# Altium PCB AmbientPro_Secondary_Board_V1.0.PcbDoc
Units mil, origin at the board's own origin, x right, y up, seen from the top; angles counter-clockwise.
Board outline 1338.58 x 452.76 mil, 4 copper layers (Top Layer, Layer 1, Layer 2, Bottom Layer), stack 61.613 mil thick; 32 components, 23 nets, 124 pads, 42 vias.
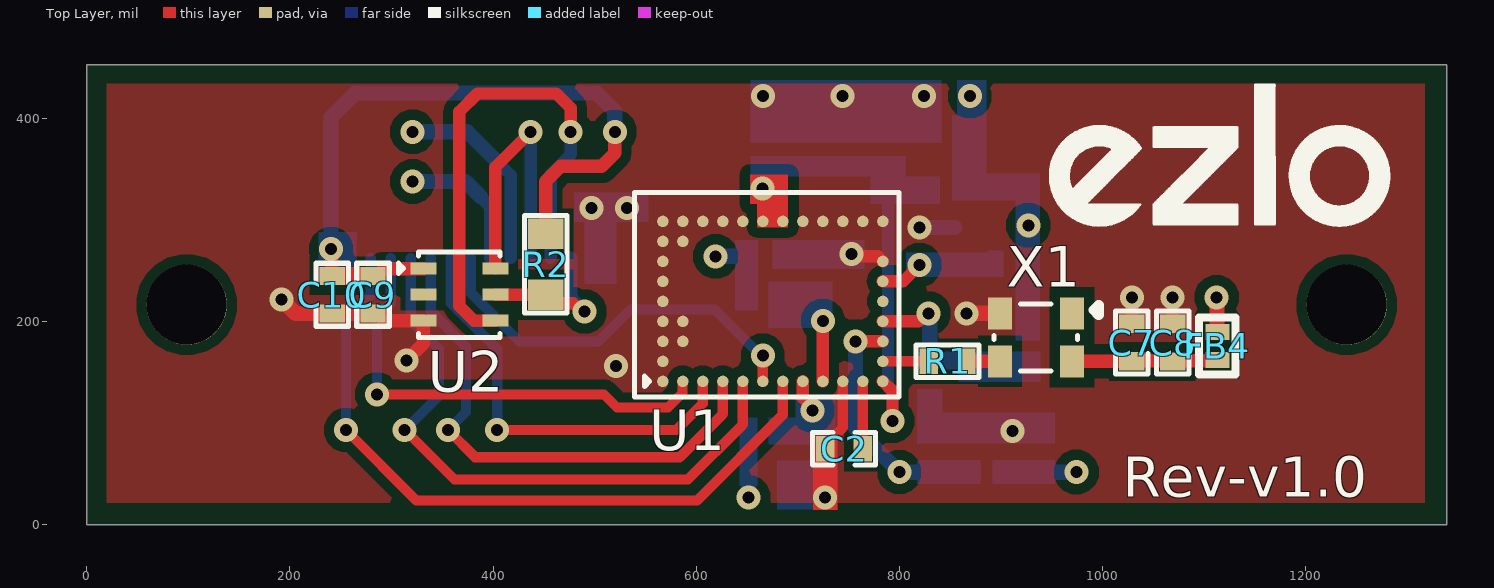
[diagram p0: Top Layer view]
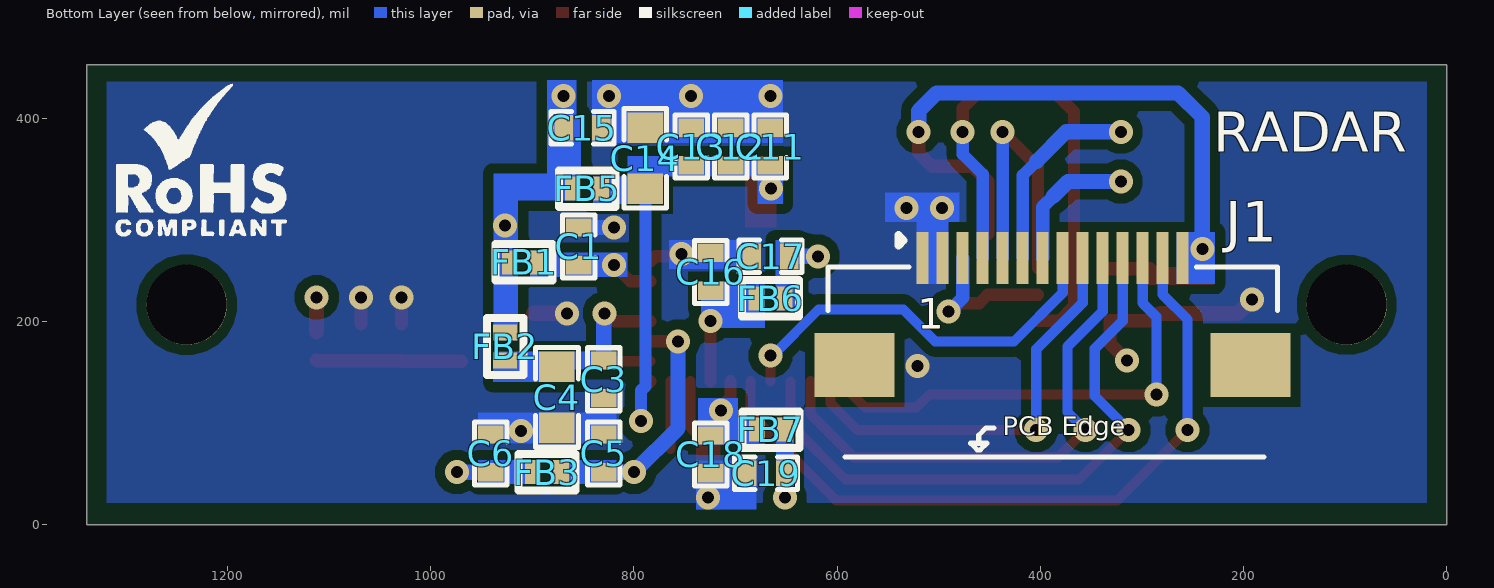
[diagram p1: Bottom Layer view, seen from below]
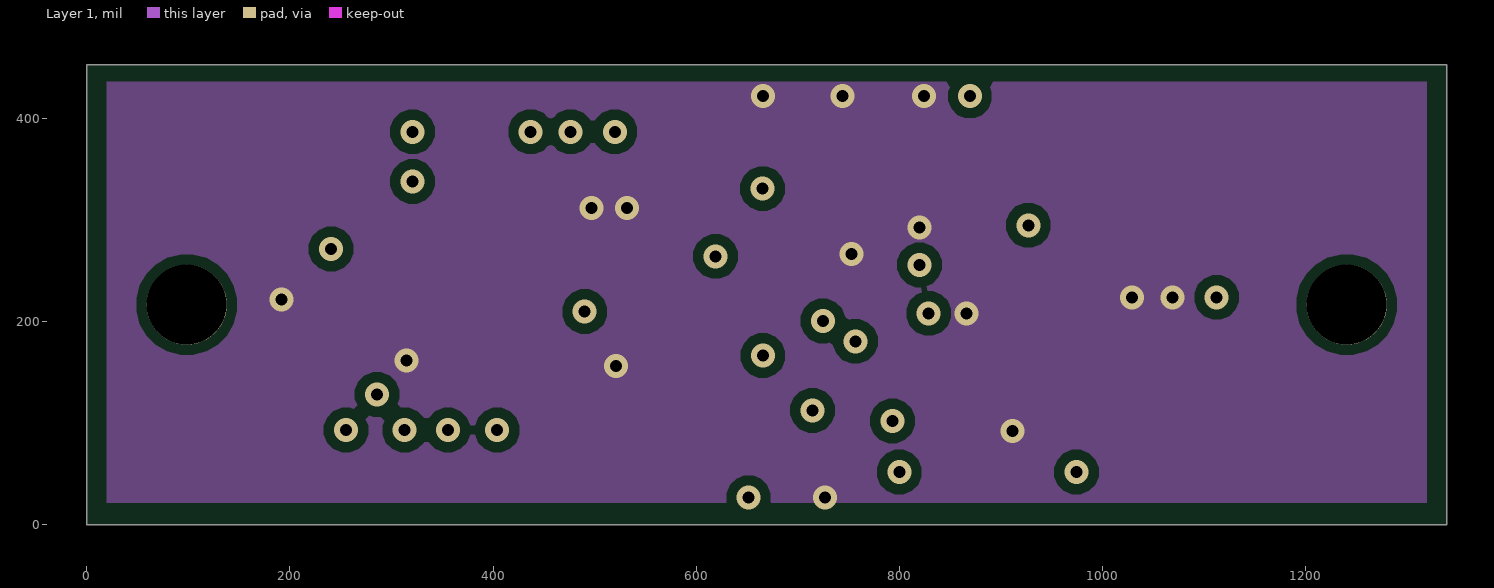
[diagram p2: Layer 1]
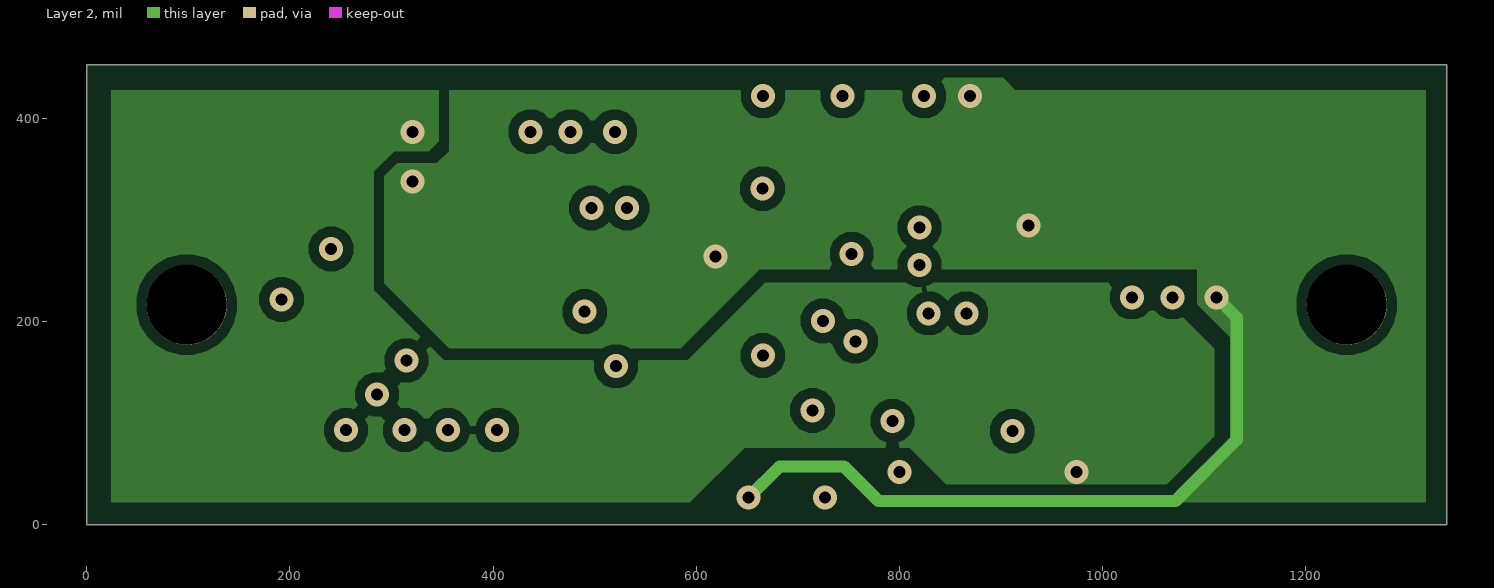
[diagram p3: Layer 2]
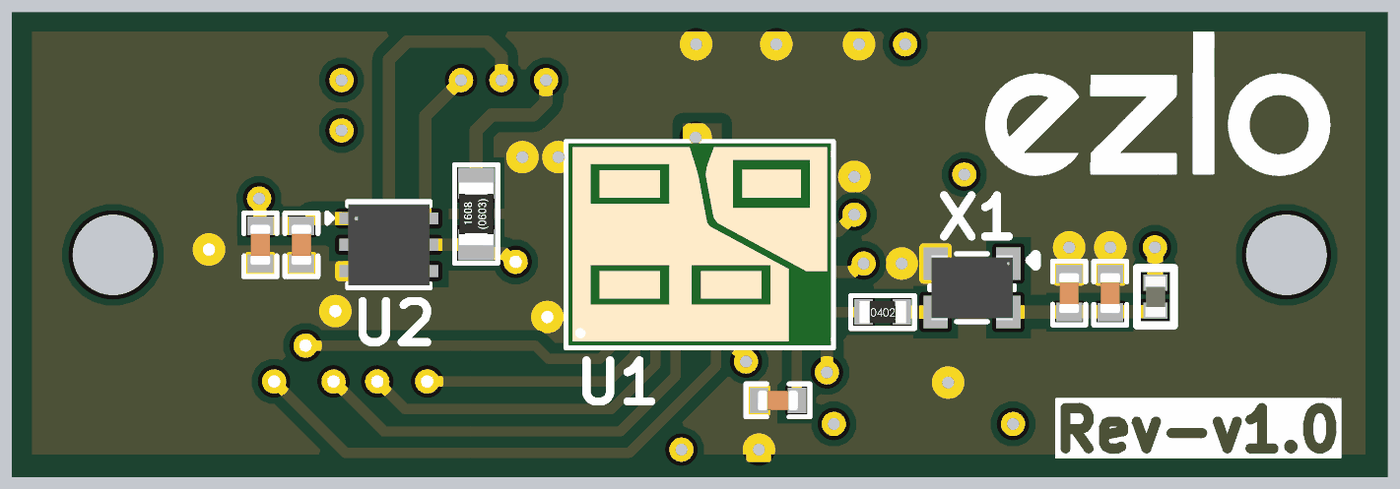
[diagram p4: 3D render of the assembled board from above, using the file's embedded part models]
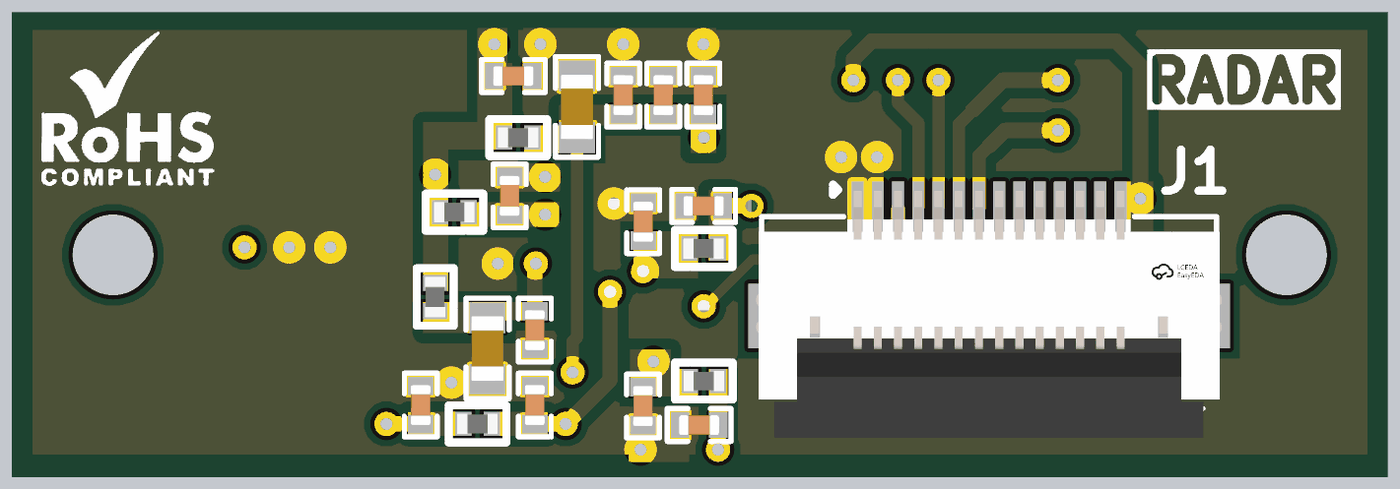
[diagram p5: 3D render of the assembled board from below, using the file's embedded part models]

## Layer stack, top to bottom
Top Solder: solder mask 0.787, Solder Resist, Dk 3.5
Top Layer: signal copper 1.378
Dielectric 2: prepreg 7.992, PP-006, Dk 4.4
Layer 1: signal copper 1.181
Dielectric 1: core 40.511, FR-4, Dk 4.6
Layer 2: signal copper 1.181
Dielectric 3: prepreg 7.992, PP-006, Dk 4.4
Bottom Layer: signal copper 1.378
Bottom Solder: solder mask 0.787, Solder Resist, Dk 3.5

## Board outline
0,0 0,452.76 1338.58,452.76 1338.58,0

## Design rules (kind name [scope] priority, off if disabled: settings)
Clearance [All] p1: gap=10 ignorepadtopadclearanceinfootprint=TRUE except(0: Arc-Hole Track-Hole SMDPad-Hole THPad-Hole Via-Hole Fill-Hole Poly-Hole Region-Hole Text-Hole; 6: Arc-Arc Arc-Track Arc-SMDPad Track-Track Track-SMDPad Track-Fill SMDPad-SMDPad; 7: SMDPad-Fill)
MinimumSolderMaskSliver [All] p1: minsoldermaskwidth=0
PolygonConnect [All] p1: thpad.connectstyle=Relief thpad.reliefconductorwidth=15 thpad.reliefentries=4 thpad.polygonreliefangle="45 Angle" thpad.airgapwidth=10 smdpad.connectstyle=Direct smdpad.reliefconductorwidth=10 smdpad.reliefentries=4 smdpad.polygonreliefangle="90 Angle" smdpad.airgapwidth=10 via.connectstyle=Direct via.reliefconductorwidth=10 via.reliefentries=4 via.polygonreliefangle="90 Angle" via.airgapwidth=10
RoutingVias [All] p1: holewidth=11.81 width=23.62 viastyle="Through Hole" minholewidth=11.81 minwidth=23.62 maxholewidth=11.81 maxwidth=23.62
SilkToSilkClearance [All] p1: silktosilkclearance=0
SilkToSolderMaskClearance [IsPad] p1: minsilkscreentomaskgap=0 clearancetoexposedcopper=TRUE
SolderMaskExpansion [All] p1: expansion=4 istentingtop=FALSE
UnRoutedNet [All] p1: checkbadconnections=TRUE
Width [All] p1: maxlimit=50 minlimit=8 preferedwidth=15 minimp=50.000000 maximp=50.000000 favimp=50.000000
26 further rules are at their usual default settings.

## Components (designator, comment, footprint, x,y, rotation, side; value= is the part's Value field where it differs from the comment)
C1 "1uF" Cap-0402 854.25,274.03 r270 bottom locked
C2 "0.47uF" Cap-0402 745.37,74.75 r180 top locked
C3 "1uF" Cap-0402 829.75,143.2 r90 bottom locked
C4 "22uF" Cap-0603 875.75,125.25 r90 bottom locked
C5 "1uF" Cap-0402 829.75,70.25 r270 bottom locked
C6 "10uF" Cap-0402 940.75,70.25 r270 bottom locked
C7 "10nF" Cap-0402 1028.75,179.32 r270 top locked
C8 "1uF" Cap-0402 1068.75,179.25 r90 top locked
C9 "0.1uF" Cap-0402 281.75,226.38 r90 top locked
C10 "1uF" Cap-0402 241.75,226.38 r90 top locked
C11 "1uF" Cap-0402 665.75,372.25 r270 bottom locked
C12 "1uF" Cap-0402 704.75,372.25 r270 bottom locked
C13 "1uF" Cap-0402 743.75,372.25 r270 bottom locked
C14 "22uF" Cap-0603 788.75,360.75 r270 bottom locked
C15 "10uF" Cap-0402 850.68,390.75 r0 bottom locked
C16 "0.1uF" Cap-0402 724.28,248.85 r270 bottom locked
C17 "10uF" Cap-0402 665.5,264.18 r180 bottom locked
C18 "1uF" Cap-0402 724.5,69.25 r90 bottom locked
C19 "10uF" Cap-0402 669.87,50.75 r180 bottom locked
FB1 "100MHz" IND-0402 908.03,258.14 r0 bottom locked
FB2 "100MHz" IND-0402 926.75,175.48 r90 bottom locked
FB3 "100MHz" IND-0402 885.53,51.75 r0 bottom locked
FB4 "100MHz" IND-0402 1112.75,175.75 r90 top locked
FB5 "100MHz" IND-0402 845.96,330.75 r0 bottom locked
FB6 "100MHz" IND-0402 665.5,222.75 r180 bottom locked
FB7 "100MHz" IND-0402 665.25,93.56 r180 bottom locked
J1 "AFC01-S14FCC-00" AFC01-S14FCC-00 387.8,209.75 r180 bottom locked
R1 "150R" Res-0402 847.25,160.82 r0 top locked
R2 "10K" Res-0603 451.75,256.38 r270 top locked
U1 "BGT60TR13CE6327XUMA1" pg-vf2bga-40 675.29,219.88 r0 top locked
U2 "LTR-303ALS" "6-Pin ChipLED" 366.75,226.38 r0 top locked
X1 "80MHz" KC2016K 934.18,184.45 r180 top locked

## Footprints (in the part's own frame and the unit in brackets; to place one, negate y for a bottom-side part, rotate by r counter-clockwise, add the part's x,y. Pads: shape width x height; smd on the part's side, far side on the other; paste and mask are expansions set on the pad)
"6-Pin ChipLED" [mm] "SENSOR OPT AMBIENT 6DFN"
  rect 0.65x0.3 smd: 1(-0.9,0.65) 2(-0.9,0) 3(-0.9,-0.65) 4(0.9,-0.65) 5(0.9,0) 6(0.9,0.65)
  silkscreen extent -1.52,-1.07 1.02,1.07, body extent -1,-1 1,1, height 0.71
AFC01-S14FCC-00 [mm]
  rect 0.3x1.3 smd: 1(-3.25,1.34) 2(-2.75,1.34) 3(-2.25,1.34) 4(-1.75,1.34) 5(-1.25,1.34) 6(-0.75,1.34) 7(-0.25,1.34) 8(0.25,1.34) 9(0.75,1.34) 10(1.25,1.34) 11(1.75,1.34) 12(2.25,1.34) 13(2.75,1.34) 14(3.25,1.34)
  rect 2x1.6 smd: MP1(-4.95,-1.34) MP2(4.95,-1.34)
  silkscreen extent -5.62,-3.63 5.62,1.91, body extent -5.75,-4.35 5.75,1.75, height 2.01
Cap-0402 [mil]
  rect 18x25 smd mask+2.36: 1(-18.5,0) 2(18.5,0)
  silkscreen extent -31,-16 31,16, body extent -20,-10 20,10, height 19
Cap-0603 [mil]
  rect 30x35 smd mask+2.36: 1(-30,0) 2(30,0)
  silkscreen extent -49,-21 49,21, body extent -32,-16 31,16, height 34
IND-0402 [mm]
  rect 0.4x0.6 smd: 1(-0.35,0) 2(0.35,0)
  silkscreen extent -0.71,-0.46 0.71,0.46, body extent -0.5,-0.25 0.5,0.25, height 0.25
KC2016K [mm]
  rect 0.6x0.8 smd: 1(-0.9,-0.6) 2(0.9,-0.6) 3(0.9,0.6) 4(-0.9,0.6)
  silkscreen extent -1.57,-0.84 1.04,0.84, body extent -1,-0.8 1,0.8, height 0.81
pg-vf2bga-40 [mm]
  round 0.285 smd: A1(-2.75,-2) A2(-2.75,-1.5) A3(-2.75,-1) A4(-2.75,-0.5) A5(-2.75,0) A6(-2.75,0.5) A7(-2.75,1) A8(-2.75,1.5) A9(-2.75,2) B1(-2.25,-2) B3(-2.25,-1) B4(-2.25,-0.5) B8(-2.25,1.5) B9(-2.25,2) C1(-1.75,-2) C9(-1.75,2) D1(-1.25,-2) D9(-1.25,2) E1(-0.75,-2) E9(-0.75,2) F1(-0.25,-2) F9(-0.25,2) G1(0.25,-2) G9(0.25,2) H1(0.75,-2) H9(0.75,2) J1(1.25,-2) J9(1.25,2) K1(1.75,-2) K9(1.75,2) L1(2.25,-2) L9(2.25,2) M1(2.75,-2) M2(2.75,-1.5) M3(2.75,-1) M4(2.75,-0.5) M5(2.75,0) M6(2.75,0.5) M7(2.75,1) M9(2.75,2)
  silkscreen extent -3.45,-2.39 3.15,2.72, body extent -3.4,-2.32 3.1,2.68, height 0.9
Res-0402 [mil]
  rect 18x25 smd mask+2.17: 1(-18.5,0) 2(18.5,0)
  silkscreen extent -32,-17 32,16, body extent -23,-11 23,11, height 16
Res-0603 [mil]
  rect 30x35 smd: 1(-30,0) 2(30,0)
  silkscreen extent -48,-21 48,21, body extent -31,-17 31,17, height 18

## Part data
C1 C3 C5 C8 C10 C11 C12 C13 C18: library part CC0402KRX5R6BB105, "CAP CER 1UF 10V X5R 0402", Case Code (Imperial)=0402, Case Code (Metric)=1005, Dielectric=X5R, LCSC Part Number=C106254, Manufacturer=Yageo, Max Operating Temperature=85°C, Min Operating Temperature=-55°C, Package Quantity=1, Resistor Type=Ceramic, Supplier Part Number 1=603-CC402KRX5R6BB105, Tolerance=10%, Voltage Rating=10V, Capacitance=1uF, Case/Package=0402, Category="Ceramic Capacitors", ComponentLink1Description=https://datasheet.ciiva.com/176/upy-gphc-x5r-4v-to-50v-12-176704.pdf?src-supplier=Digi-Key, ComponentLink1URL=https://datasheet.ciiva.com/176/upy-gphc-x5r-4v-to-50v-12-176704.pdf?src-supplier=Digi-Key, ComponentLink2Description=https://datasheet.ciiva.com/176/mlccorderingcode-176705.pdf?src-supplier=Digi-Key, ComponentLink2URL=https://datasheet.ciiva.com/176/mlccorderingcode-176705.pdf?src-supplier=Digi-Key, ComponentLink3Description=https://datasheet.ciiva.com/176/mlccorderingcode-176706.pdf?src-supplier=Digi-Key, ComponentLink3URL=https://datasheet.ciiva.com/176/mlccorderingcode-176706.pdf?src-supplier=Digi-Key, Construction=Flat, Depth=0.5mm, Dissipation Factor=15%, Halogen Free="Halogen Free", Height=0.5mm, Lead Free="Lead Free", Length=1mm, Manufacturer Part Number=CC0402KRX5R6BB105, Mount="Surface Mount", Number of Pins=2, Packaging="Tape and Reel", Pricing 1="1=0.11000, 10=0.05500, 50=0.05500, 100=0.03300, 500=0.02700, 1000=0.02200, 2500=0.02100, 10000=0.01800 (USD)", Radiation Hardening=No, REACH SVHC="No SVHC", RoHS=Yes, RoHS Compliant=Yes, Series=CC, Stock 1=6711367, Supplier 1=Mouser, Termination=SMD/SMT, Thickness=0.022inch, Voltage Rating (DC)=10V, Width=0.02inch
C2: library part UMK105ABJ474KV-F, "CAP CER 0.47UF 50V X5R 0402", Capacitance=470nF, Case Code (Imperial)=0402, Case Code (Metric)=1005, Dielectric=X5R, LCSC Part Number=C386109, Manufacturer="Taiyo Yuden", Max Operating Temperature=85°C, Min Operating Temperature=-55°C, Package Quantity=10000, Supplier Part Number 1=587-3497-1-ND, Tolerance=10%, Voltage Rating=50V, Case/Package=0402, Category="Ceramic Capacitors", ComponentLink1Description=https://datasheet.ciiva.com/30249/584umk105abj474kv-f-30249824.pdf?src-supplier=Onlinecomponents.com, ComponentLink1URL=https://datasheet.ciiva.com/30249/584umk105abj474kv-f-30249824.pdf?src-supplier=Onlinecomponents.com, ComponentLink2Description=https://datasheet.ciiva.com/24370/10umk105abj474kv-f-24370678.pdf?src-supplier=Onlinecomponents.com, ComponentLink2URL=https://datasheet.ciiva.com/24370/10umk105abj474kv-f-24370678.pdf?src-supplier=Onlinecomponents.com, ComponentLink3Description=https://datasheet.ciiva.com/18697/mlcc-all-e-18697429.pdf?src-supplier=Digi-Key, ComponentLink3URL=https://datasheet.ciiva.com/18697/mlcc-all-e-18697429.pdf?src-supplier=Digi-Key, ComponentLink4Description=https://datasheet.ciiva.com/18697/mlcc-all-e-18697430.pdf?src-supplier=Digi-Key, ComponentLink4URL=https://datasheet.ciiva.com/18697/mlcc-all-e-18697430.pdf?src-supplier=Digi-Key, ComponentLink5Description=https://datasheet.ciiva.com/18697/mlcc-all-e-18697431.pdf?src-supplier=Digi-Key, ComponentLink5URL=https://datasheet.ciiva.com/18697/mlcc-all-e-18697431.pdf?src-supplier=Digi-Key, Height=0.5mm, Item Type=Capacitor, Lead Free="Lead Free", Length=0.039inch, Manufacturer Part Number=UMK105ABJ474KV-F, Mount="Surface Mount", Packaging="Tape and Reel", Pricing 1="1=0.24000, 10=0.16100, 50=0.09680, 100=0.08170, 500=0.05592, 1000=0.04946, 2500=0.04731, 5000=0.04301 (USD)", RoHS=Yes, RoHS Compliant=Yes, Stock 1=145003, Supplier 1=Digi-Key, Termination=SMD/SMT, Thickness=0.022inch, Voltage Rating (DC)=50V, Width=0.02inch
C4 C14: library part CC0603MRX5R6BB226, "CAP CER 22UF 10V X5R 0603", Case Code (Imperial)=0603, Case Code (Metric)=1608, Dielectric=X5R, LCSC Part Number=C109447, Manufacturer=Yageo, Max Operating Temperature=85°C, Min Operating Temperature=-55°C, Package Quantity=4000, Supplier Part Number 1=311-1819-1-ND, Tolerance=20%, Voltage Rating=10V, Capacitance=22uF, Case/Package=0603, Category="Ceramic Capacitors", ComponentLink1Description=http://www.mouser.com/ds/2/447/Yageo_UPY-GP_NP0_16V-to-50V_9-358835.pdf?src-supplier=Mouser, ComponentLink1URL=http://www.mouser.com/ds/2/447/Yageo_UPY-GP_NP0_16V-to-50V_9-358835.pdf?src-supplier=Mouser, ComponentLink2Description=http://www.yageo.com/documents/recent/UPY-GPHC_X5R_4V-to-50V_25.pdf?src-supplier=Digi-Key, ComponentLink2URL=http://www.yageo.com/documents/recent/UPY-GPHC_X5R_4V-to-50V_25.pdf?src-supplier=Digi-Key, Halogen Free="Halogen Free", Height=0.8mm, Lead Free="Lead Free", Length=0.063inch, Manufacturer Part Number=CC0603MRX5R6BB226, Mount="Surface Mount", Packaging="Tape and Reel", Pricing 1="1=0.68000, 10=0.48000, 50=0.36300, 100=0.31610, 500=0.23416, 1000=0.19903 (USD)", RoHS=Yes, RoHS Compliant=Yes, Stock 1=19628, Supplier 1=Digi-Key, Termination=SMD/SMT, Thickness=0.035inch, Voltage Rating (DC)=10V, Weight=7.1E-05oz, Width=0.8mm
C6 C15 C17 C19: library part CL05A106MP5NUNC, "CAP CER 10UF 10V X5R 0402", Case Code (Imperial)=0402, Case Code (Metric)=1005, Dielectric=X5R, LCSC Part Number=C315248, Manufacturer=Samsung, Max Operating Temperature=85°C, Min Operating Temperature=-55°C, Package Quantity=1, Tolerance=20%, Voltage Rating=10V, Capacitance=10uF, Case/Package=0402, Category="Ceramic Capacitors", ComponentLink1Description=https://datasheet.ciiva.com/25721/cl05a106mp5nunc-25721584.pdf?src-supplier=Digi-Key, ComponentLink1URL=https://datasheet.ciiva.com/25721/cl05a106mp5nunc-25721584.pdf?src-supplier=Digi-Key, ComponentLink2Description=https://datasheet.ciiva.com/26838/getdatasheetpartid-745310-26838170.pdf?src-supplier=Verical, ComponentLink2URL=https://datasheet.ciiva.com/26838/getdatasheetpartid-745310-26838170.pdf?src-supplier=Verical, Construction=Flat, Contact Plating=Tin, Depth=0.5mm, Item Type=Capacitor, Lead Free="Lead Free", Length=1mm, Manufacturer Part Number=CL05A106MP5NUNC, Mount="Surface Mount", Packaging="Tape and Reel", Pricing 1="10000=0.02537 (USD)", Radiation Hardening=No, RoHS=Yes, RoHS Compliant=Yes, Series=CL, Stock 1=1729850, Supplier 1=Avnet, Supplier Part Number 1=CL05A106MP5NUNC, Termination=Wraparound, Thickness=0.028inch, Width=0.02inch
C7: library part CC0402KRX7R8BB103, "CAP CER 10000PF 25V X7R 0402", Case Code (Imperial)=0402, Case Code (Metric)=1005, Dielectric=X7R, LCSC Part Number=C327025, Manufacturer=Yageo, Max Operating Temperature=125°C, Min Operating Temperature=-55°C, Package Quantity=1, Supplier Part Number 1=311-1337-1-ND, Tolerance=10%, Voltage Rating=25V, Capacitance=10nF, Case/Package=0402, ComponentLink1Description=http://www.yageo.com/documents/recent/UPY-GPHC_X7R_6.3V-to-50V_18.pdf?src-supplier=Digi-Key, ComponentLink1URL=http://www.yageo.com/documents/recent/UPY-GPHC_X7R_6.3V-to-50V_18.pdf?src-supplier=Digi-Key, ComponentLink2Description=https://www.verical.com/server-webapp/html/getDatasheet?partID=375418&src-supplier=Verical, ComponentLink2URL=https://www.verical.com/server-webapp/html/getDatasheet?partID=375418&src-supplier=Verical, ComponentLink3Description=http://www.yageo.com/documents/recent/UPY-GPHC_X7R_6.3V-to-50V_8.pdf?src-supplier=Avnet, ComponentLink3URL=http://www.yageo.com/documents/recent/UPY-GPHC_X7R_6.3V-to-50V_8.pdf?src-supplier=Avnet, ComponentLink4Description=https://4donline.ihs.com/images/VipMasterIC/IC/YAGO/YAGO-S-A0003557223/YAGO-S-A0003557223-1.pdf?hkey=52A5661711E402568146F3353EA87419&src-supplier=Element14, ComponentLink4URL=https://4donline.ihs.com/images/VipMasterIC/IC/YAGO/YAGO-S-A0003557223/YAGO-S-A0003557223-1.pdf?hkey=52A5661711E402568146F3353EA87419&src-supplier=Element14, ComponentLink5Description=http://www.farnell.com/datasheets/2167236.pdf?src-supplier=Element14, ComponentLink5URL=http://www.farnell.com/datasheets/2167236.pdf?src-supplier=Element14, ComponentLink6Description=http://www.mouser.com/ds/2/447/Yageo_UPY-GP_NP0_16V-to-50V_9-358835.pdf?src-supplier=Mouser, ComponentLink6URL=http://www.mouser.com/ds/2/447/Yageo_UPY-GP_NP0_16V-to-50V_9-358835.pdf?src-supplier=Mouser, Composition=Ceramic, Depth=0.5mm, Halogen Free="Halogen Free", Height=0.5mm, Lead Free="Lead Free", Length=1mm, Manufacturer Part Number=CC0402KRX7R8BB103, Mount="Surface Mount", Packaging="Tape and Reel", Pricing 1="1=0.1, 10=0.021, 100=0.0093, 500=0.00666, 1000=0.00523, 2500=0.00476, 5000=0.00438 (USD)", Radiation Hardening=No, REACH SVHC=Unknown, Stock 1=0, Supplier 1=Digi-Key, Termination=SMD/SMT, Thickness=0.022inch, Voltage Rating (DC)=25V, Width=0.02inch
C9: library part C1005X5R1H104K050BB, "CAP CER 0.1UF 50V X5R 0402", Capacitance=100nF, Case Code (Imperial)=0402, Case Code (Metric)=1005, Dielectric=X5R, Dielectric Material=Ceramic, LCSC Part Number=C2181865, Manufacturer=TDK, Max Operating Temperature=85°C, Min Operating Temperature=-55°C, Package Quantity=1, Supplier Part Number 1=445-5942-1-ND, Tolerance=10%, Voltage=50V, Case/Package=0402, ComponentLink1Description=https://product.tdk.com/info/en/catalog/spec/mlccspec_commercial_general_midvoltage_en.pdf?src-supplier=Digi-Key, ComponentLink1URL=https://product.tdk.com/info/en/catalog/spec/mlccspec_commercial_general_midvoltage_en.pdf?src-supplier=Digi-Key, ComponentLink2Description=http://www.tdk.co.jp/tefe02/e413_c.pdf?src-supplier=Future+Electronics, ComponentLink2URL=http://www.tdk.co.jp/tefe02/e413_c.pdf?src-supplier=Future+Electronics, ComponentLink3Description=https://www.verical.com/server-webapp/html/getDatasheet?partID=743571&src-supplier=Verical, ComponentLink3URL=https://www.verical.com/server-webapp/html/getDatasheet?partID=743571&src-supplier=Verical, ComponentLink4Description=http://www.tdk.co.jp/tefe02/e412_c.pdf?src-supplier=Avnet+Europe, ComponentLink4URL=http://www.tdk.co.jp/tefe02/e412_c.pdf?src-supplier=Avnet+Europe, Construction=Flat, Depth=0.5mm, Height=0.5mm, Lead Free="Lead Free", Length=1mm, Manufacturer Part Number=C1005X5R1H104K050BB, Mount="Surface Mount", Packaging="Tape and Reel", Pricing 1="1=0.12, 10=0.09, 50=0.049, 100=0.04, 500=0.02858, 1000=0.02245, 2500=0.02041, 5000=0.01878 (USD)", Radiation Hardening=No, REACH SVHC="No SVHC", Resistor Type=Ceramic, RoHS Compliant=Yes, Series=C, Stock 1=1455182, Supplier 1=Digi-Key, Termination=SMD/SMT, Thickness=0.022inch, Voltage Rating=50V, Voltage Rating (DC)=50V, Weight=2.3E-05oz, Width=0.02inch
C16: library part CL05B104KB54PNC, "CAP CER 0.1UF 50V X7R 0402", LCSC Part Number=C307331, Manufacturer=Samsung, Supplier Part Number 1=1276-CL05B104KB54PNCDKR-ND, Manufacturer Part Number=CL05B104KB54PNC, Pricing 1="1=0.1, 10=0.067, 50=0.0366, 100=0.0299, 500=0.02138, 1000=0.01681, 2500=0.01528, 5000=0.01406 (USD)", Stock 1=8594, Supplier 1=Digi-Key
FB1 FB2 FB3 FB4 FB5 FB6 FB7: library part BLM15PD121SN1D, "FERRITE BEAD 120 OHM 0402 1LN", Case Code (Imperial)=0402, Case Code (Metric)=1005, Current Rating=1.3A, DC Resistance (DCR)=90mR, LCSC Part Number=C76891, Manufacturer=Murata, Max Operating Temperature=125°C, Min Operating Temperature=-55°C, Package Quantity=1, Tolerance=25%, Case/Package=0402, Category="Ferrite Beads and Chips", ComponentLink1Description=https://datasheet.ciiva.com/11800/0900766b811b5866-11800860.pdf?src-supplier=RSComponents, ComponentLink1URL=https://datasheet.ciiva.com/11800/0900766b811b5866-11800860.pdf?src-supplier=RSComponents, ComponentLink2Description=https://datasheet.ciiva.com/18093/getdatasheetpartid-195858-18093157.pdf?src-supplier=Verical, ComponentLink2URL=https://datasheet.ciiva.com/18093/getdatasheetpartid-195858-18093157.pdf?src-supplier=Verical, ComponentLink3Description=https://datasheet.ciiva.com/41425/001171686-da-01-en-chip-drossel0402-120r-1300ma-1-0x0-5mm-41425776.pdf?src-supplier=Conrad, ComponentLink3URL=https://datasheet.ciiva.com/41425/001171686-da-01-en-chip-drossel0402-120r-1300ma-1-0x0-5mm-41425776.pdf?src-supplier=Conrad, ComponentLink4Description=https://datasheet.ciiva.com/41449/001172205-da-01-en-drossel-0402-120r-11-0x0-5mm-10000st-41449495.pdf?src-supplier=Conrad, ComponentLink4URL=https://datasheet.ciiva.com/41449/001172205-da-01-en-drossel-0402-120r-11-0x0-5mm-10000st-41449495.pdf?src-supplier=Conrad, ComponentLink5Description=https://datasheet.ciiva.com/1012/l0110e-1012435.pdf?src-supplier=Digi-Key, ComponentLink5URL=https://datasheet.ciiva.com/1012/l0110e-1012435.pdf?src-supplier=Digi-Key, ComponentLink6Description=https://datasheet.ciiva.com/1012/l0110e-1012434.pdf?src-supplier=Digi-Key, ComponentLink6URL=https://datasheet.ciiva.com/1012/l0110e-1012434.pdf?src-supplier=Digi-Key, ComponentLink7Description=https://datasheet.ciiva.com/1012/l0110e-1012436.pdf?src-supplier=Digi-Key, ComponentLink7URL=https://datasheet.ciiva.com/1012/l0110e-1012436.pdf?src-supplier=Digi-Key, Core Material=Ferrite, DC Current=1.3A, DC Resistance-Max=90mR, Depth=0.55mm, Height=0.5mm, Impedance=120R, Item Type="Ferrite Bead", Lead Free="Lead Free", Length=1mm, Manufacturer Part Number=BLM15PD121SN1D, Material=Steel,Ferrite, Max Current Rating=1.3A, Max DC Current=1.3A, Military Standard=Not, Number of Circuits=1, Number of Lines=1, Number of Pins=2, Packaging="Tape and Reel", Pricing 1="10000=0.03238, 20000=0.03063, 40000=0.02888, 60000=0.02713, 80000=0.02538, 100000=0.02363, 1000000=0.02188 (USD)", Radiation Hardening=No, Reach SVHC Compliant=Yes, RoHS=Yes, RoHS Compliant=Yes, Series=BLM15PD, Stock 1=300000, Supplier 1=Avnet, Supplier Part Number 1=BLM15PD121SN1D, Termination=SMD/SMT, Test Frequency=100MHz, Width=0.5mm
J1: "Clamshell 14P Bottom Contact Surface Mount 0.5mm SMD,P=0.5mm FFC/FPC Connectors ROHS", LCSC Part Number=C577443, Manufacturer=JUSHUO, Package=SMD,P=0.5mm, ComponentLink1Description=LCSC, ComponentLink1URL=https://www.lcsc.com/product-detail/FFC-FPC-Connectors_JUSHUO-AFC01-S14FCC-00_C577443.html, Item Type="FFC/FPC Connector", Manufacturer Part Number=AFC01-S14FCC-00
R1: library part ERJ-2GEJ151X, "RES SMD 150 OHM 5% 1/10W 0402", Case Code (Imperial)=0402, Case Code (Metric)=1005, LCSC Part Number=C412976, Manufacturer=Panasonic, Max Operating Temperature=155°C, Max Power Dissipation=100mW, Min Operating Temperature=-55°C, Package Quantity=10000, Ratings=AEC-Q200, Resistance Tolerance=5%, Resistor Type="Thick Film", Supplier Part Number 1=65T8254, Temperature Coefficient=200ppm/°C, Voltage Rating=50V, Case/Package=0402, Category="Chip SMD Resistors", ComponentLink1Description=https://datasheet.ciiva.com/11821/0900766b80f806dd-11821182.pdf?src-supplier=RSComponents, ComponentLink1URL=https://datasheet.ciiva.com/11821/0900766b80f806dd-11821182.pdf?src-supplier=RSComponents, ComponentLink2Description=https://datasheet.ciiva.com/43460/1500035-43460367.pdf?src-supplier=Farnell, ComponentLink2URL=https://datasheet.ciiva.com/43460/1500035-43460367.pdf?src-supplier=Farnell, ComponentLink3Description=https://datasheet.ciiva.com/6082/1500035-6082105.pdf?src-supplier=Farnell, ComponentLink3URL=https://datasheet.ciiva.com/6082/1500035-6082105.pdf?src-supplier=Farnell, ComponentLink4Description=https://datasheet.ciiva.com/46377/1500035-46377070.pdf?src-supplier=Element14, ComponentLink4URL=https://datasheet.ciiva.com/46377/1500035-46377070.pdf?src-supplier=Element14, ComponentLink5Description=https://datasheet.ciiva.com/28568/1678796-28568939.pdf?src-supplier=Element14, ComponentLink5URL=https://datasheet.ciiva.com/28568/1678796-28568939.pdf?src-supplier=Element14, ComponentLink6Description=https://datasheet.ciiva.com/16773/70260739-16773454.pdf?src-supplier=Allied+Electronics, ComponentLink6URL=https://datasheet.ciiva.com/16773/70260739-16773454.pdf?src-supplier=Allied+Electronics, ComponentLink7Description=https://datasheet.ciiva.com/30178/4aoa0000ce1-30178453.pdf?src-supplier=Onlinecomponents.com, ComponentLink7URL=https://datasheet.ciiva.com/30178/4aoa0000ce1-30178453.pdf?src-supplier=Onlinecomponents.com, Construction=Rectangular, Contact Plating=Tin, Depth=0.5mm, Features="Automotive AEC-Q200", Height=0.35mm, Item Type=Resistor, Lead Free="Lead Free", Length=1mm, Manufacturer Part Number=ERJ-2GEJ151X, Military Standard=Not, Mount="Surface Mount", Number of Terminations=2, Packaging="Tape and Reel", Power Rating=100mW, Pricing 1="1=0.10100, 25=0.03200, 100=0.01300, 250=0.01100, 500=0.00900, 1000=0.00500 (USD)", Radiation Hardening=No, Reach SVHC Compliant=Yes, Resistance=150R, RoHS=Yes, RoHS Compliant=Yes, Series=ERJ, Stock 1=19191, Supplier 1=Avnet, Technology="THICK FILM", Termination=SMD/SMT, Tolerance=5%, Voltage Rating (DC)=50V, Weight=2.8E-05oz, Width=0.5mm, Working Voltage=50V
R2: library part RC0603FR-0710KL, "RES SMD 10K Ohm 1% 1/10W 0603", Case Code (Imperial)=0603, Case Code (Metric)=1608, LCSC Part Number=C98220, Manufacturer=Yageo, Max Operating Temperature=155°C, Max Power Dissipation=100mW, Min Operating Temperature=-55°C, Resistance=10kR, Resistance Tolerance=1%, Resistor Type="Thick Film", Supplier Part Number 1=311-10.0KHRCT-ND, Temperature Coefficient=100ppm/°C, Voltage Rating=75V, Voltage Rating (DC)=50V, Case/Package=0603, Category="Chip SMD Resistors", ComponentLink1Description=https://datasheet.ciiva.com/7660/38590-7660789.pdf?src-supplier=Element14, ComponentLink1URL=https://datasheet.ciiva.com/7660/38590-7660789.pdf?src-supplier=Element14, ComponentLink2Description=https://datasheet.ciiva.com/7983/443971-7983596.pdf?src-supplier=Element14, ComponentLink2URL=https://datasheet.ciiva.com/7983/443971-7983596.pdf?src-supplier=Element14, ComponentLink3Description=https://datasheet.ciiva.com/22747/443971-22747519.pdf?src-supplier=Element14, ComponentLink3URL=https://datasheet.ciiva.com/22747/443971-22747519.pdf?src-supplier=Element14, ComponentLink4Description=https://datasheet.ciiva.com/46440/1868787-46440891.pdf?src-supplier=Element14, ComponentLink4URL=https://datasheet.ciiva.com/46440/1868787-46440891.pdf?src-supplier=Element14, ComponentLink5Description=https://datasheet.ciiva.com/7746/1738695-7746239.pdf?src-supplier=Element14, ComponentLink5URL=https://datasheet.ciiva.com/7746/1738695-7746239.pdf?src-supplier=Element14, ComponentLink6Description=https://datasheet.ciiva.com/15189/getdatasheetpartid-409289-15189591.pdf?src-supplier=Verical, ComponentLink6URL=https://datasheet.ciiva.com/15189/getdatasheetpartid-409289-15189591.pdf?src-supplier=Verical, Construction=Rectangular, Depth=0.8mm, Features="Moisture Resistant", Height=0.45mm, Item Type=Resistor, Lead Free="Lead Free", Lead Pitch=0.3mm, Length=1.6mm, Manufacturer Part Number=RC0603FR-0710KL, Military Standard=Not, Number of Pins=2, Number of Terminations=2, Packaging="Tape and Reel", Power Rating=100mW, Pricing 1="1=0.10000, 10=0.02400, 100=0.00970, 1000=0.00436, 2500=0.00378 (USD)", REACH SVHC=Unknown, RoHS=Yes, RoHS Compliant=Yes, Series=RC, Size Code=0603, Stock 1=25249139, Supplier 1=Digi-Key, Termination=SMD/SMT, Tolerance=1%, Weight=7.1E-05oz, Width=0.8mm
U1: "Rf Transceiver PG-VF2BGA-40", LCSC Part Number=C3606641, Manufacturer=Infineon, Supplier Part Number 1=25AK0242, Category="RF Receivers, Transceivers", ComponentLink1Description=LCSC, ComponentLink1URL=https://www.lcsc.com/product-detail/RF-Transceiver-ICs_Infineon-Technologies-BGT60TR13CE6327XUMA1_C3606641.html, Item Type=IC, Manufacturer Part Number=BGT60TR13CE6327XUMA1, Pricing 1="1=20.67000, 10=18.89000, 25=17.50000, 50=16.72000, 100=15.93000, 250=15.16000, 500=14.94000, 1000=14.51000 (USD)", RoHS=No, Stock 1=4397, Supplier 1=Newark
U2: library part LTR-303ALS-01, "SENSOR OPT AMBIENT 6DFN", Case/Package=DFN, LCSC Part Number=C364577, Manufacturer="Vishay Lite-On", Max Operating Temperature=70°C, Min Operating Temperature=-30°C, Category=Uncategorized, ComponentLink1Description=http://optoelectronics.liteon.com/upload/download/DS86-2013-0004/LTR-303ALS-01_DS_V1.pdf?src-supplier=Digi-Key, ComponentLink1URL=http://optoelectronics.liteon.com/upload/download/DS86-2013-0004/LTR-303ALS-01_DS_V1.pdf?src-supplier=Digi-Key, ComponentLink2Description=http://optoelectronics.liteon.com/upload/download/DS86-2013-0004/P_100_LTR-303ALS-01%20DS.pdf?src-supplier=Avnet, ComponentLink2URL=http://optoelectronics.liteon.com/upload/download/DS86-2013-0004/P_100_LTR-303ALS-01%20DS.pdf?src-supplier=Avnet, Item Type="Ambient Light Sensor", Manufacturer Part Number=LTR-303ALS-01, Mounting Technology="Surface Mount", Output Type=I2C, Packaging="Cut Tape", Pins=6, Pricing 1="1=0.5742, 10=0.465, 25=0.4604, 100=0.394, 250=0.39, 500=0.3741, 1000=0.3355 (USD)", RoHS=Yes, RoHS Compliant=Yes, Series=-, Stock 1=1717, Supplier 1="Arrow Electronics", Supplier Part Number 1=LTR-303ALS-01
X1: library part KC2016K80.0000C1GE00_1, "XTAL OSC XO 80.0000MHZ CMOS SMD", Case/Package=SMD/SMT, Frequency Stability=50ppm, LCSC Part Number=C1988243, Manufacturer="Kyocera AVX", Manufacturer Part Number=KC2016K80.0000C1GE00, Max Operating Temperature=85°C, Max Supply Current=8mA, Min Operating Temperature=-40°C, Supplier Part Number 1=478-KC2016K80.0000C1GE00CT-ND, Category=Oscillators, ComponentLink1Description=http://www.mouser.com/ds/2/40/clock_k_e-522534.pdf?src-supplier=Mouser, ComponentLink1URL=http://www.mouser.com/ds/2/40/clock_k_e-522534.pdf?src-supplier=Mouser, ComponentLink2Description=http://www.kyocera-crystal.jp/eng/wp-content/uploads/2014/09/pkg_e.pdf?src-supplier=Digi-Key, ComponentLink2URL=http://www.kyocera-crystal.jp/eng/wp-content/uploads/2014/09/pkg_e.pdf?src-supplier=Digi-Key, ComponentLink3Description=http://global.kyocera.com/prdct/electro/product/pdf/clock_k_e.pdf?src-supplier=Digi-Key, ComponentLink3URL=http://global.kyocera.com/prdct/electro/product/pdf/clock_k_e.pdf?src-supplier=Digi-Key, Frequency=80MHz, Height=0.031inch, Item Type=Crystal, Lead Free="Lead Free", Length=0.079inch, Mount="Surface Mount", Packaging="Tape and Reel", Pricing 1="1=1.31000, 10=1.25300, 50=1.22440, 100=1.04940, 500=1.02024, 1000=0.85992 (USD)", RoHS=Yes, RoHS Compliant=No, Stock 1=350, Supplier 1=Digi-Key, Width=0.063inch

## Free pads (board coordinates)
  round 78.74 hole 78.74 unplated: MH0(98.43,216.54) MH0(1240.16,216.54)

## Via types
v1: diameter 23.62, hole 11.81, Top Layer to Bottom Layer, 42 vias

## Nets (pads, with @x,y where several pads share a name; then routed paths per layer and width w, separated by ;. In a path a pad name is that pad's centre, name@x,y a point inside that pad or via, vN(x,y) a via of type N, cw(c..) or ccw(c..) an arc to the next point about the centre after c; other vN are vias at no path point)
1V8_SENSOR: C15.2 C17.2 C19.2 FB1.2 FB2.2 FB4.2 FB5.2 FB6.2 FB7.2 J1.7 | length 904.8
  Top Layer w12: v1(1112.18,223.82) v1@1112.46,223.53 ; FB4.2@1112.46,189.82 FB4.2
  Top Layer w15: FB4.2@1112.46,189.82 v1@1112.46,223.53
  Layer 2 w12: v1(651.47,26.75) 682.12,57.4 745.35,57.4 779.38,23.37 1071.74,23.37 1132,83.63 1132,203.99 v1(1112.18,223.82)
  Bottom Layer w12: C19.2 C19.2@651.42,50.7 ; v1(651.47,26.75) v1(651.47,26.75)
  Bottom Layer w13: 387.4,323.06 397.64,312.82 J1.7
  Bottom Layer w15: v1(320.75,337.75) 372.71,337.75 387.4,323.06 ; v1(619,264.18) C17.2 ; v1(651.47,26.75) C19.2@651.42,50.7
  other v1: 926.75,294.75 869.18,421.75
3V3_SENSOR: C6.2 FB3.2 J1.6 | length 229.1
  Bottom Layer w12: 403.54,357.75 417.32,343.97 J1.6
  Bottom Layer w15: v1(320.75,386.75) 374.54,386.75 403.54,357.75 ; C6.2 v1(974.1,51.75)
+3V3: C9.2 C10.2 J1.14 R2.1 U2.1 | length 678
  Top Layer w13: v1(240.54,271.38) 241.14,270.77 241.14,245.48 C10.2 ; C9.2 285.25,244.88 292.34,251.97 U2.1 ; R2.1 451.75,337.83 466.66,352.74 506.74,352.74 519.75,365.75 v1(519.75,386.75)
  Bottom Layer w15: v1(240.54,271.38) 240.54,401.05 264.38,424.89 502.02,424.89 519.75,407.16 v1(519.75,386.75)
BGT_CLK: J1.12 U1.B1 | length 460
  Top Layer w10: v1@289.31,128.13 509.14,128.13 521.96,115.31 572.16,115.31 586.48,129.62 586.48,140.9 U1.B1
  Bottom Layer w10: v1(285.75,128.13) 285.75,204.68 299.21,218.14 J1.12
BGT_CS: J1.13 U1.G1 | length 706.1
  Top Layer w10: v1(255.15,93.17) 324.57,23.75 600.65,23.75 685.13,108.23 U1.G1
  Bottom Layer w10: v1(255.15,93.17) 255.15,202.12 279.53,226.5 J1.13
BGT_IRQ: J1.9 U1.C1 | length 423.3
  Top Layer w10: v1(404.06,93.17) 580.27,93.17 606.39,119.3 U1.C1
  Bottom Layer w10: J1.9 358.27,218.47 404.06,172.67 v1(404.06,93.17)
BGT_MISO: J1.11 U1.E1 | length 612.1
  Top Layer w10: v1@313.24,93.17 361.93,44.49 591.7,44.49 645.76,98.55 U1.E1@645.76,140.92
  Bottom Layer w10: v1(312.99,93.17) 346.45,126.63 346.45,173.15 318.9,200.7 J1.11
BGT_MOSI: J1.10 U1.D1 | length 522.7
  Top Layer w10: v1(355.53,93.17) 382.34,66.36 583.59,66.36 626.08,108.86 U1.D1
  Bottom Layer w10: J1.10 338.58,210.07 373.36,175.3 373.36,111 v1(355.53,93.17)
BGT_RST: J1.8 U1.F1 | length 398.7
  Top Layer w10: U1.F1 v1(665.45,166.43)
  Bottom Layer w10: J1.8 377.95,228.35 425.95,180.35 503.39,180.35 534.86,211.82 618.28,211.82 663.67,166.43 v1(665.45,166.43)
GND: C1.1 C2.2 C3.1 C4.1 C5.1 C6.1 C7.1 C8.2 C9.1 C10.1 C11.1 C12.1 C13.1 C14.1 C15.1 C16.1 C17.1 C18.1 C19.1 J1.1 J1.2 U1.A1 U1.A2 U1.A3 U1.A4 U1.A5 U1.A6 U1.A7 U1.A8 U1.A9 U1.B3 U1.B4 U1.B8 U1.B9 U1.C9 U1.D9 U1.E9 U1.H9 U1.J9 U1.K1 U1.K9 U1.L9 U1.M7 U1.M9 U2.3 X1.2 | length 424.4
  Top Layer w10: 726.87,51.75 726.87,55.25 ; C2.2 726.87,78.25 744.19,95.57 U1.K1
  Top Layer w12: v1(752.95,266.55) 755.17,264.33 778.48,264.33 U1.M7
  Top Layer w13: C9.1 285.25,207.88 292.34,200.79 U2.3 331.32,178.32 v1(314.75,161.75) ; C7.1 v1(1028.75,223.82) ; C8.2 v1(1068.75,223.82)
  Top Layer w15: v1(191.75,221.75) 205.62,207.88 C9.1 ; v1(865.75,208.07) X1.2
  Bottom Layer w15: v1(819.75,292.53) C1.1
  other v1: 726.87,26.75 910.97,92.07 521,156 496.75,311.75 531.75,311.75 665.75,421.75 743.75,421.75 824.31,421.75
INT_ALS: J1.3 R2.2 U2.5 | length 153.3
  Top Layer w12: U2.5 R2.2 460.14,217.99 478.77,217.99 487.01,209.75 v1(490.16,209.75)
  Bottom Layer w13: J1.3 476.38,223.53 v1(490.16,209.75)
NetC7_2: C7.2 C8.1 FB4.1 X1.4 | length 143.4
  Top Layer w13: X1.4 C7.2 ; C7.2@1028.75,161.4 1068.75,161.4 1112.18,161.4 FB4.1
NetR1_2: R1.2 X1.3 | length 33
  Top Layer w13: R1.2 X1.3
OSC_80M: R1.1 U1.M2 | length 45.2
  Top Layer w10: U1.M2 R1.1
SCL: J1.4 U2.4 | length 511.4
  Top Layer w12: U2.4 381.15,200.79 366.75,215.19 366.75,406.46 384.73,424.43 462.07,424.43 476.38,410.12 v1(476.38,386.75)
  Bottom Layer w12: J1.4 456.69,344.97 476.38,364.66 v1(476.38,386.75)
SDA: J1.5 U2.6 | length 272.9
  Top Layer w12: U2.6@402.18,252.52 402.18,351.93 v1(437.01,386.75)
  Bottom Layer w12: J1.5 v1(437.01,386.75)
VAREF: C2.1 U1.L1 | length 66.4
  Top Layer w10: C2.1 U1.L1
VDD_A: C16.2 FB6.1 U1.J1 | length 89.3
  Top Layer w12: U1.J1 v1@724.5,200.61
  Bottom Layer w13: C16.2 724.28,200.83 v1(724.48,200.64)
VDD_D: C18.2 FB7.1 U1.H1 | length 32.5
  Top Layer w12: U1.H1 704.82,124.95 714.32,115.45 v1(714.32,112.58)
VDD_LF: C5.2 FB3.1 U1.M3 | length 203.1
  Top Layer w12: v1(756.59,180.51) U1.M3
  Bottom Layer w15: v1@756.59,179.98 756.59,94.91 v1(799.75,51.75) C5.2
VDD_PLL: C3.2 C4.2 FB2.1 U1.M4 | length 95.2
  Top Layer w12: U1.M4 818.54,200.19 826.42,208.07 v1(828.75,208.07)
  Bottom Layer w15: v1(828.75,208.07) 829.75,207.07 C3.2
VDD_RF: C11.2 C12.2 C13.2 C14.2 FB5.1 U1.F9 U1.G9 U1.M1 | length 273.5
  Top Layer w12: U1.M1 793.01,131.69 v1(793.01,102.05)
  Bottom Layer w12: C14.2 788.75,136.3 793.01,132.04 v1(793.01,102.05)
  other v1: 665.25,330.75
VDD_VCO: C1.2 FB1.1 U1.M6 | length 42.9
  Top Layer w12: U1.M6 803.56,239.56 v1(819.75,255.75)
pads on no net: J1.MP1 J1.MP2 U1.M5 U2.2 X1.1

## Polygon pours and split planes (outlines as drawn)
3V3_SENSOR on Layer 2 "3V3_SENSOR_L03_P001" (solid, pour order 1): 24,427.75 24,22 593.71,22 647.71,76 810.16,76 846.15,40 1063,40 1110,87 1110,173.36 1045.36,238 667.87,238 591.63,161.75 351.59,161.75 282.75,230.59 282.75,347.75 302.75,367.75 336.75,367.75 346.75,377.75 346.75,427.75
1V8_SENSOR on Layer 2 "1V8_SENSOR_L03_P000" (solid, pour order 0): 1093,251.41 1093,217 1125.65,184.35 1125.65,86.27 1071.74,32.37 1071.74,22 1318,22 1318,427.75 914,427.75 902,439.75 844.75,439.75 832.75,427.75 356.75,427.75 356.75,367.75 344.75,355.75 305.75,355.75 292.75,342.75 292.75,237.75 356.75,173.75 584.63,173.75 662.29,251.41
GND on Layer 1 "GND_L02_P003" (solid, pour order 3): 19.75,21.75 1318.75,21.75 1318.75,435.75 19.75,435.75
GND on Bottom Layer "GND_L04_P002" (solid, pour order 2): 19.75,21.75 1318.75,21.75 1318.75,435.75 19.75,435.75
GND on Top Layer "GND_L01_P004" (solid, pour order 4): 19.75,21.75 1317,21.75 1317,434 19.75,434

## Other copper
Top Layer:
  rectangle net +3V3: 229.25,235.88 294.25,253.88
  rectangle net GND: 714.75,14.67 738.75,87.25
  rectangle net VDD_RF: 652.95,315.91 690.45,344.75
  rectangle net VDD_RF: 659.9,292.76 690.45,344.75
Bottom Layer:
  rectangle net 1V8_SENSOR: 642.37,38.25 660.37,105.37
  rectangle net VDD_D: 671.16,78.75 737,105.37
  rectangle net +3V3: 227.93,236.92 265.75,288.1
  rectangle net VDD_PLL: 858.25,140.25 938.56,170.7
  rectangle net GND: 817.25,79.75 842.25,133.7
  rectangle net 1V8_SENSOR: 856.33,345.75 885.75,437.69
  rectangle net GND: 771.25,375.75 841.18,437.69
  rectangle net GND: 653.25,375.75 806.25,437.69
  rectangle net VDD_RF: 771.25,315.75 840.06,342.56
  rectangle net GND: 675,251.68 765.41,280
  rectangle net VDD_A: 671.13,193.6 733.87,239.35
  rectangle net VDD_A: 671.13,205.83 689.48,234.24
  region net VDD_LF: 879.62,63.56 817.25,63.56 817.25,39.94 879.62,39.94
  rectangle net 3V3_SENSOR: 891.44,39.94 953.25,63.56
  rectangle net GND: 817.25,79.75 953.25,110.25
  rectangle net VDD_RF: 771.25,315.75 806.25,362.75
  rectangle net VDD_RF: 653.25,342.75 806.25,362.75
  rectangle net VDD_RF: 653.25,315.75 678.25,362.75
  rectangle net VDD_PLL: 858.25,140.25 893.25,170.25
  rectangle net VDD_PLL: 817.25,152.7 938.56,170.7
  rectangle net VDD_VCO: 806.25,243.75 902.12,267.75
  rectangle net VDD_VCO: 886.38,246.33 902.12,269.95
  rectangle net 1V8_SENSOR: 851.87,318.94 938.4,345.75
  rectangle net 1V8_SENSOR: 913.93,181.38 938.4,345.75
  rectangle net 1V8_SENSOR: 851.87,318.94 885.75,403.25
  rectangle net VDD_D: 697.49,78.75 737,124.7
  rectangle net GND: 679.37,14.75 738.75,63.25
  rectangle net 1V8_SENSOR: 638.02,210.94 660.65,280
  rectangle net GND: 479.75,297.91 552.8,327.19
  rectangle net GND: 490.16,236.92 521.65,327.19

## Silkscreen, mask and mechanical layers (free items; w line width, h text height)
Top Overlay:
  drawing of 4 lines, arcs and shapes, not listed
  text "Rev-v1.0" at 1019.69,27.32 h39.37
Bottom Overlay:
  drawing of 14 lines, arcs and shapes, not listed
  text "RADAR" at 229.63,367.07 h39.37
Dimensions:
  circle w0.25: c701.72,188.18 r0.12
  lines w0.5: 295.08,267.72 302.95,267.72 ; 334.45,267.72 342.32,267.72 ; 354.13,267.72 362.01,267.72 ; 472.24,267.72 480.12,267.72 ; 59.06,216.54 ccw(c98.43,216.54) 137.8,216.54 ccw(c98.43,216.54) 59.06,216.54 ; 194.29,66.93 581.3,66.93 581.3,78.74 194.29,78.74 194.29,66.93 ; 208.07,133.86 ccw(c212.01,133.86) 212.01,129.92 215.75,129.92 215.75,240.16 212.01,240.16 ccw(c212.01,236.22) 208.07,236.22 208.07,173.23 213.98,167.32 213.98,151.58 208.07,145.67 208.07,133.86 ; 283.47,125.59 492.13,125.59 492.13,240.16 283.47,240.16 283.47,125.59 ; 559.84,129.92 559.84,240.16 563.58,240.16 cw(c563.58,236.22) 567.52,236.22 567.52,173.23 561.61,167.32 561.61,151.58 567.52,145.67 567.52,133.86 cw(c563.58,133.86) 563.58,129.92 559.84,129.92 ; 1200.79,216.54 ccw(c1240.16,216.54) 1279.53,216.54 ccw(c1240.16,216.54) 1200.79,216.54
Board Outline:
  the board outline again, w10
Fabrication:
  drawing of 295 lines, arcs and shapes, not listed
  text "Layer" at 2483.2,1441 h60
  text "Name" at 2893.11,1441 h60
  text "Material" at 3822.85,1441 h60
  text "Thickness" at 4682.62,1441 h60
  text "Constant" at 5332.46,1441 h60
  text "Board Layer Stack" at 5902.32,1441 h60
  text "Top Overlay" at 2893.11,1321 h60
  text "Top Solder" at 2893.11,1201 h60
  text "Solder Resist" at 3822.85,1201 h60
  text "0.79mil" at 4682.62,1201 h60
  text "3.5" at 5332.46,1201 h60
  text "1" at 2483.2,1081 h60
  text "Top Layer" at 2893.11,1081 h60
  text "1.38mil" at 4682.62,1081 h60
  text "Dielectric 2" at 2893.11,961 h60
  text "PP-006" at 3822.85,961 h60
  text "7.99mil" at 4682.62,961 h60
  text "4.4" at 5332.46,961 h60
  text "2" at 2483.2,841 h60
  text "Layer 1" at 2893.11,841 h60
  text "CF-004" at 3822.85,841 h60
  text "1.18mil" at 4682.62,841 h60
  text "Dielectric 1" at 2893.11,721 h60
  text "FR-4" at 3822.85,721 h60
  text "40.51mil" at 4682.62,721 h60
  text "4.6" at 5332.46,721 h60
  text "3" at 2483.2,601 h60
  text "Layer 2" at 2893.11,601 h60
  text "CF-004" at 3822.85,601 h60
  text "1.18mil" at 4682.62,601 h60
  text "Dielectric 3" at 2893.11,481 h60
  text "PP-006" at 3822.85,481 h60
  text "7.99mil" at 4682.62,481 h60
  text "4.4" at 5332.46,481 h60
  text "4" at 2483.2,361 h60
  text "Bottom Layer" at 2893.11,361 h60
  text "1.38mil" at 4682.62,361 h60
  text "Bottom Solder" at 2893.11,241 h60
  text "Solder Resist" at 3822.85,241 h60
  text "0.79mil" at 4682.62,241 h60
  text "3.5" at 5332.46,241 h60
  text "Bottom Overlay" at 2893.11,121 h60
  text "Total board thickness:" at 2483.2,1 h60
  text "63.19mil" at 4682.62,1 h60
Drill Drawing:
  circle w10: c85.03,1841.33 r33.33
  lines w10: 51.7,1957.99 118.36,1957.99 118.36,2024.66 51.7,2024.66 51.7,1957.99
  lines w15: -8.09,1762.99 6952.03,1762.99 ; -8.09,2062.99 6952.03,2062.99 ; 542.78,1612.99 542.78,2212.99 ; 1082.64,1612.99 1082.64,2212.99 ; 2182.32,1612.99 2182.32,2212.99 ; 2688.2,1612.99 2688.2,2212.99 ; 3422,1612.99 3422,2212.99 ; 4921.55,1612.99 4921.55,2212.99 ; 5511.4,1612.99 5511.4,2212.99 ; 6257.2,1612.99 6257.2,2212.99 ; -8.09,1612.99 6952.03,1612.99 6952.03,2212.99 -8.09,2212.99 -8.09,1612.99
  text "Symbol" at 81.91,2107.99 h72
  text "Count" at 587.78,2107.99 h72
  text "Hole Size" at 1127.64,2107.99 h72
  text "Plated" at 2227.32,2107.99 h72
  text "Hole Type" at 2733.2,2107.99 h72
  text "Drill Layer Pair" at 3467,2107.99 h72
  text "Via/Pad" at 4966.55,2107.99 h72
  text "Pad Shape" at 5556.4,2107.99 h72
  text "Template" at 6302.2,2107.99 h72
  text "2" at 587.78,1957.99 h60
  text "78.74mil (2.000mm)" at 1127.64,1957.99 h60
  text "NPTH" at 2227.32,1957.99 h60
  text "Round" at 2733.2,1957.99 h60
  text "Top Layer - Bottom Layer" at 3467,1957.99 h60
  text "Pad" at 4966.55,1957.99 h60
  text "Rounded" at 5556.4,1957.99 h60
  text "c200hn200" at 6302.2,1957.99 h60
  text "42" at 587.78,1807.99 h60
  text "11.81mil (0.300mm)" at 1127.64,1807.99 h60
  text "PTH" at 2227.32,1807.99 h60
  text "Round" at 2733.2,1807.99 h60
  text "Top Layer - Bottom Layer" at 3467,1807.99 h60
  text "Via" at 4966.55,1807.99 h60
  text "Rounded" at 5556.4,1807.99 h60
  text "v60h30" at 6302.2,1807.99 h60
  text "44 Total" at 587.78,1657.99 h60

## Text inside footprints (layer, text, board x,y; h text height)
J1: Bottom Overlay "1" at 521.17,192.75 h30; Bottom Overlay "PCB Edge" at 437.08,81.77 h31.5